# Altium PCB SYNC_BUCK_Si8233.PcbDoc
Units mil, origin at the board's own origin, x right, y up, seen from the top; angles counter-clockwise.
Board outline 3937.01 x 3937.01 mil, 2 copper layers (Top Layer, Bottom Layer); 119 components, 37 nets, 282 pads, 163 vias.
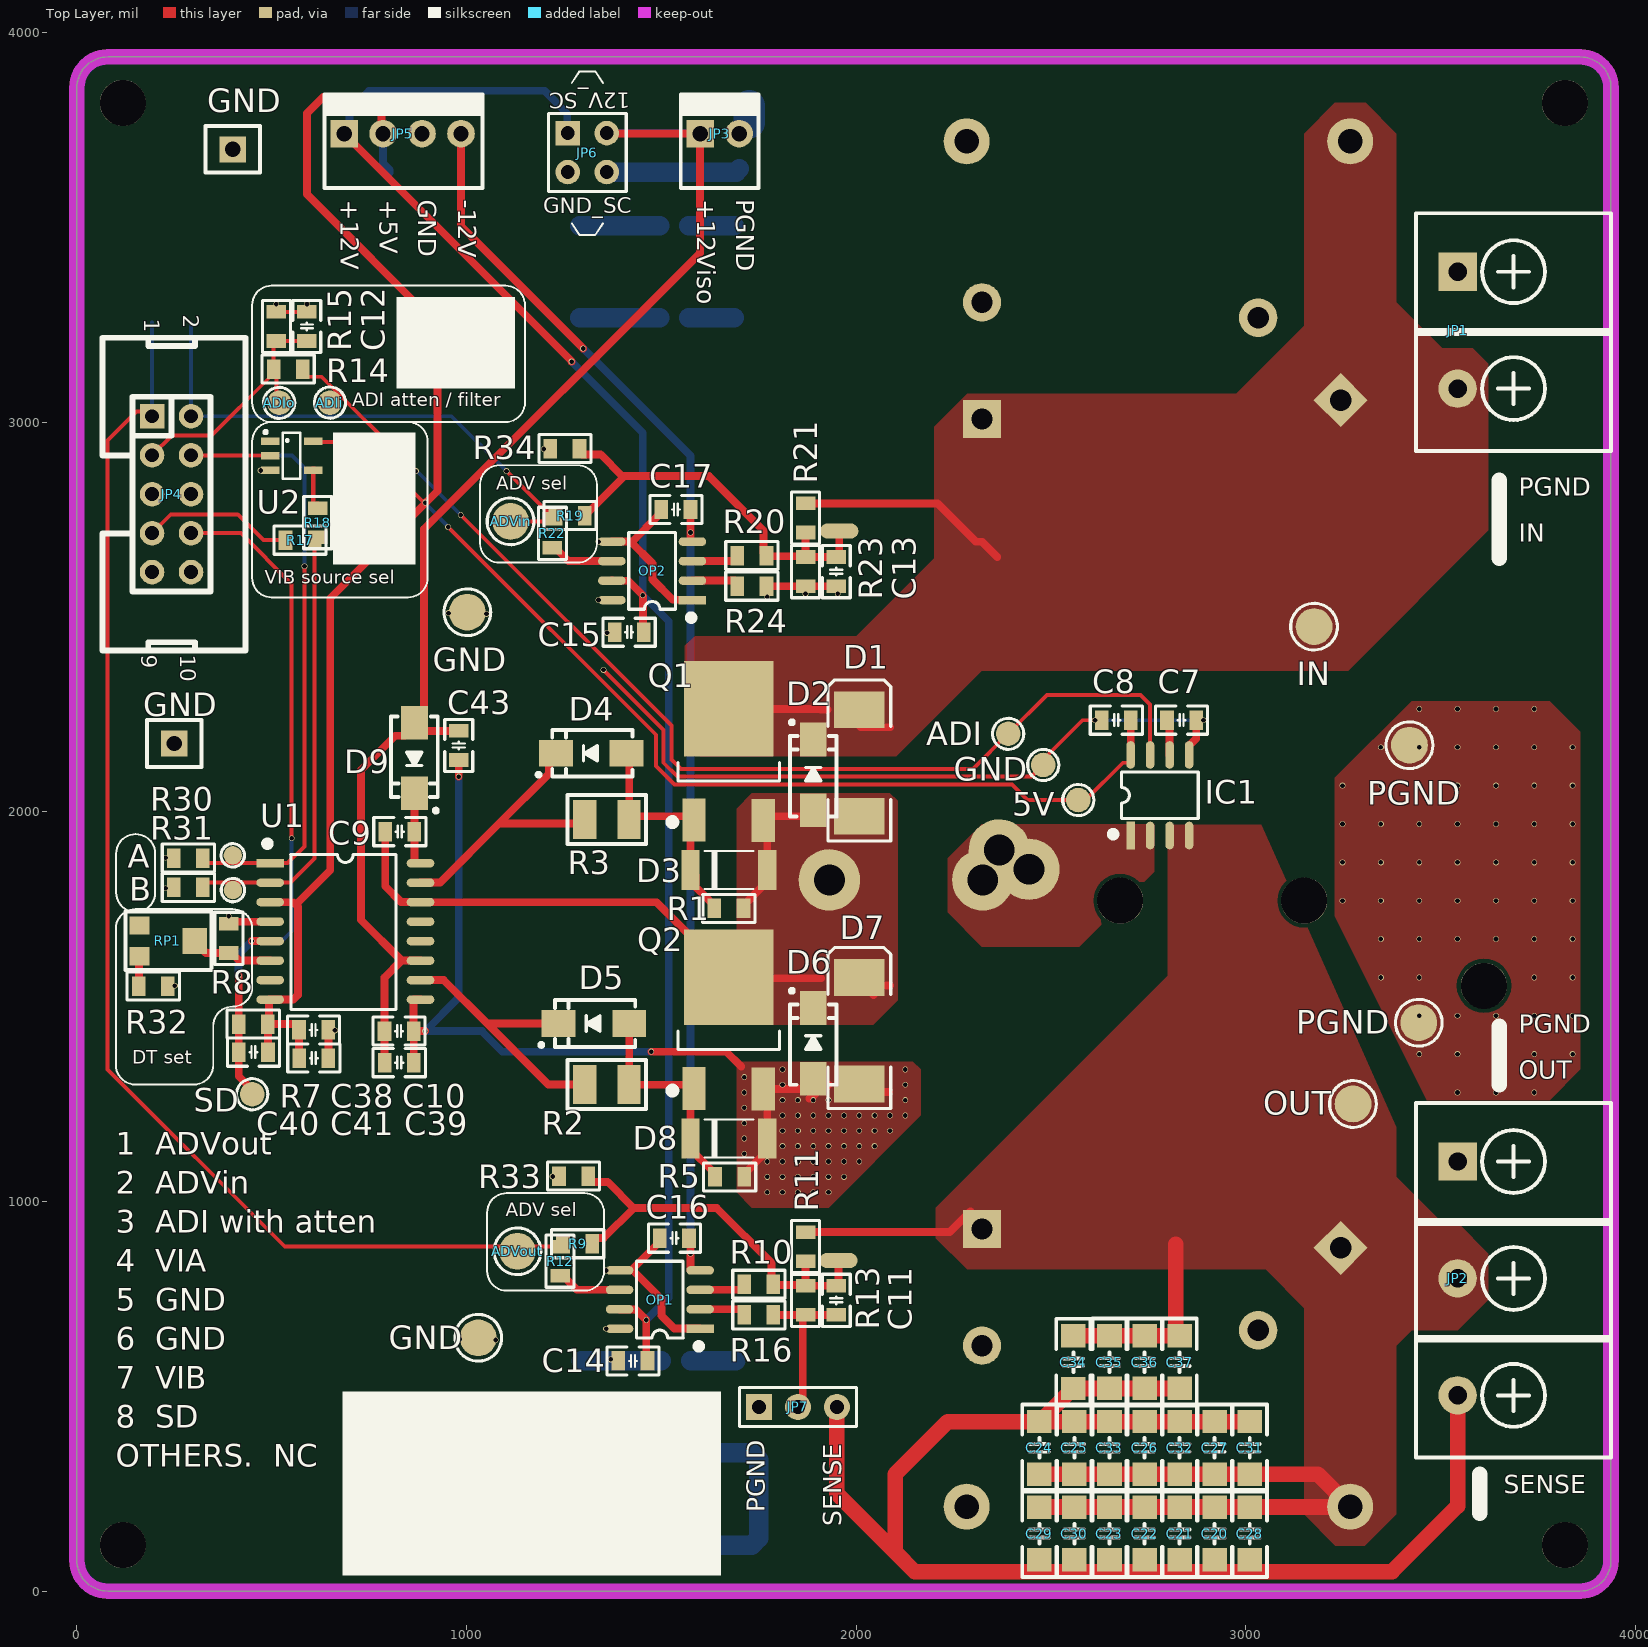
[diagram p0: Top Layer view]
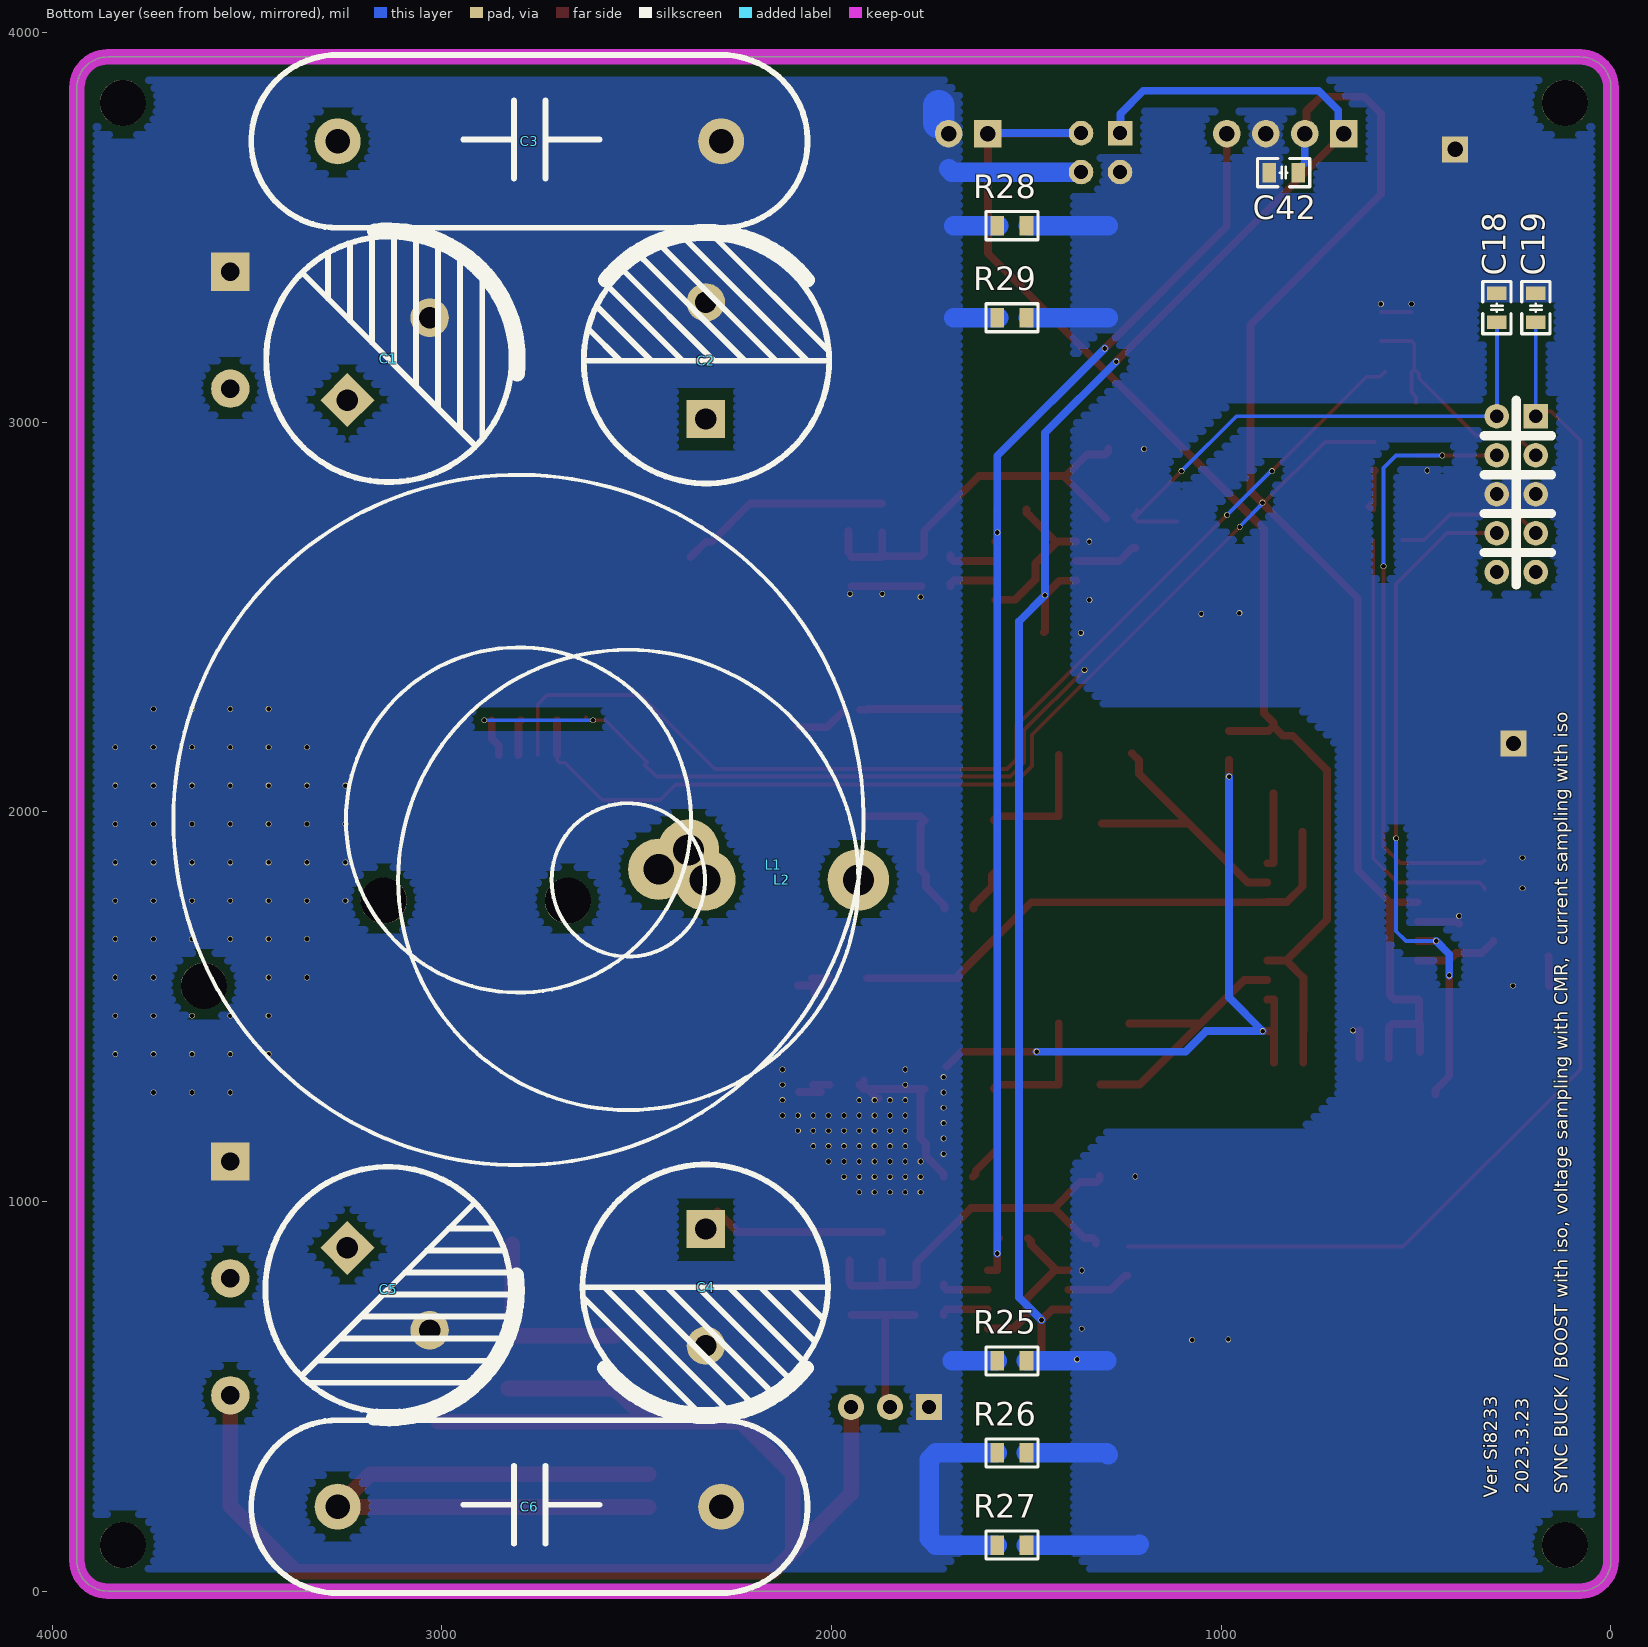
[diagram p1: Bottom Layer view, seen from below]

## Layer stack, top to bottom
Top Solder: solder mask 0.4, Solder Resist, Dk 3.5
Top Layer: signal copper 1.4
Dielectric 1: dielectric 12.6, FR-4, Dk 4.8
Bottom Layer: signal copper 1.4
Bottom Solder: solder mask 0.4, Solder Resist, Dk 3.5

## Board outline
0,78.74 0,3858.27 cw(c78.74,3858.27) 78.74,3937.01 3858.27,3937.01 cw(c3858.27,3858.27) 3937.01,3858.27 3937.01,78.74 cw(c3858.27,78.74) 3858.27,0 78.74,0 cw(c78.74,78.74)

## Design rules (kind name [scope] priority, off if disabled: settings)
Clearance GND [InNet('GND') And OnLayer('Bottom Layer')] p1: gap=10 ignorepadtopadclearanceinfootprint=TRUE except(0: Arc-Hole Track-Hole SMDPad-Hole THPad-Hole Via-Hole Text-Hole; 20: Arc-Fill Arc-Poly Arc-Region Track-Fill Track-Poly Track-Region SMDPad-Fill SMDPad-Poly SMDPad-Region THPad-Fill THPad-Poly THPad-Region Via-Fill Via-Poly Via-Region Fill-Fill Fill-Poly Fill-Region Fill-Hole Poly-Poly Poly-Region Poly-Hole Region-Region Region-Hole)
Clearance PGND_1 [InNet('PGND') And OnLayer('Bottom Layer')] p2: gap=10 ignorepadtopadclearanceinfootprint=TRUE except(0: Arc-Hole Track-Hole SMDPad-Hole THPad-Hole Via-Hole Text-Hole; 20: Arc-Fill Arc-Poly Arc-Region Track-Fill Track-Poly Track-Region SMDPad-Fill SMDPad-Poly SMDPad-Region THPad-Fill THPad-Poly THPad-Region Via-Fill Via-Poly Via-Region Fill-Fill Fill-Poly Fill-Region Fill-Hole Poly-Poly Poly-Region Poly-Hole Region-Region Region-Hole)
Clearance [All] p3: gap=10 ignorepadtopadclearanceinfootprint=TRUE except(0: Arc-Hole Track-Hole SMDPad-Hole THPad-Hole Via-Hole Fill-Text Poly-Text Region-Text Text-Hole)
HoleSize [All] p1 off: absolutevalues=TRUE maxlimit=100 minlimit=1 maxpercent=80.000 minpercent=20.000
MinimumSolderMaskSliver [All] p1 off: minsoldermaskwidth=10
PolygonConnect [All] p1: connectstyle=Direct reliefconductorwidth=10 reliefentries=4 polygonreliefangle="90 Angle" airgapwidth=10
RoutingVias [All] p1: holewidth=28 width=50 viastyle="Through Hole" minholewidth=28 minwidth=50 maxholewidth=28 maxwidth=50
SilkToSilkClearance [All] p1 off: silktosilkclearance=10
SilkToSolderMaskClearance [IsPad] p1 off: minsilkscreentomaskgap=10 clearancetoexposedcopper=TRUE
SolderMaskExpansion [All] p1: expansion=4 istentingtop=FALSE
Width [All] p1: maxlimit=100 minlimit=5 preferedwidth=10
26 further rules are at their usual default settings.

## Components (designator, comment, footprint, x,y, rotation, side; value= is the part's Value field where it differs from the comment)
5V "TEST" "TEST 1.6" 2570,2030 r180 top
A "TEST" "TEST 1.2" 400.1,1888.07 r180 top
ADI "TEST" "TEST 1.6" 2390,2200 r180 top
ADIi "TEST" "TEST 1.6" 649.47,3049.89 r180 top
ADIo "TEST" "TEST 1.6" 519.2,3049.34 r270 top
ADVin "TEST" "TEST 2.4" 1113.1,2745.2 r270 top
ADVout "TEST" "TEST 2.4" 1130.66,872.04 r270 top
B "TEST" "TEST 1.2" 400.42,1798.87 r180 top
C1 "1000uF" "CAP 7.5*16*25" 3136.22,3160.87 r135 bottom
C2 "1000uF" "CAP 7.5*16*25" 2321.33,3157.48 r90 bottom
C3 "4.7uF" "CBB 25" 2775.59,3720.47 r0 bottom
C4 "1000uF" "CAP 7.5*16*25" 2324.33,779.53 r270 bottom
C5 "1000uF" "CAP 7.5*16*25" 3138.34,774.02 r225 bottom
C6 "4.7uF" "CBB 25" 2775.59,216.54 r0 bottom
C7 "102" "C 0805_L" 2835,2234.96 r180 top
C8 "104" "C 0805_L" 2667.6,2234.96 r0 top
C9 "105" "C 0805_L" 828.74,1948.82 r0 top
C10 "475" "C 0805_L" 826.77,1437.01 r180 top
C11 "102" "C 0805_L" 1948.82,746.07 r90 top
C12 "103" "C 0805_L" 590,3245.4 r270 top
C13 "102" "C 0805_L" 1948.82,2616.14 r90 top
C14 "104" "C 0805_L" 1427.17,590.55 r0 top
C15 "104" "C 0805_L" 1417.32,2460.63 r0 top
C16 "104" "C 0805_L" 1533.47,905.51 r0 top
C17 "104" "C 0805_L" 1537.4,2775.59 r0 top
C18 "102" "C 0805_L" 293,3293.51 r90 bottom
C19 "102" "C 0805_L" 193,3293.51 r90 bottom
C20 "106" "C 1206_M" 2920,147.5 r90 top
C21 "106" "C 1206_M" 2830,147.5 r90 top
C22 "106" "C 1206_M" 2740,147.5 r90 top
C23 "106" "C 1206_M" 2650,147.5 r90 top
C24 "106" "C 1206_M" 2470,367.5 r270 top
C25 "106" "C 1206_M" 2560,367.5 r270 top
C26 "106" "C 1206_M" 2740,367.5 r270 top
C27 "106" "C 1206_M" 2920,367.5 r270 top
C28 "106" "C 1206_M" 3010,147.5 r90 top
C29 "106" "C 1206_M" 2470,147.5 r90 top
C30 "106" "C 1206_M" 2560,147.5 r90 top
C31 "106" "C 1206_M" 3010,367.5 r270 top
C32 "106" "C 1206_M" 2830,367.5 r270 top
C33 "106" "C 1206_M" 2650,367.5 r270 top
C34 "106" "C 1206_M" 2557.32,587.32 r90 top
C35 "106" "C 1206_M" 2650,587.5 r90 top
C36 "106" "C 1206_M" 2740,587.5 r90 top
C37 "106" "C 1206_M" 2830,587.5 r90 top
C38 "104" "C 0805_L" 607.4,1440 r0 top
C39 "106" "C 0805_L" 827.37,1355.91 r180 top
C40 "330" "C 0805_L" 453.14,1382.94 r0 top
C41 "105" "C 0805_L" 608.11,1367.66 r0 top
C42 "106" "C 0805_L" 840,3640 r0 bottom
C43 "106" "C 0805_L" 980,2170 r270 top
D1 "SS34" SMC 2007.87,2125 r90 top
D2 "SS34" SMA 1889.76,2094.49 r90 top
D3 "15V" LL41 1667.12,1843.64 r0 top
D4 "RS1M" SMA 1320,2150 r180 top
D5 "RS1M" SMA 1326.77,1456.69 r180 top
D6 "SS34" SMA 1889.76,1405.51 r90 top
D7 "SS34" SMC 2007.87,1437.99 r90 top
D8 "15V" LL41 1667.12,1154.66 r0 top
D9 "RS1M" SMA 866.14,2137.8 r270 top
GND "TEST" "TEST 1.6" 2480,2120 r180 top
GND "TEST TP" "TEST TP1.4_B" 400,3700 r180 top
GND "TEST TP" "TEST TP1.4_B" 250,2175 r180 top
GND "TEST" "TEST 2.4" 1030,650 r180 top
GND "TEST" "TEST 2.4" 1002,2512 r180 top
IC1 "ACS712" SOP8_N 2779.33,2042.32 r90 top
IN "TEST" "TEST 2.4" 3175,2475 r180 top
JP1 "HDR-1X2" KF7620-2P 3687.01,3235.83 r270 top
JP2 "HDR-1X3" KF7620-3P 3687.01,802.36 r270 top
JP3 "HDR-1X2" KF2510-LI-2P 1649.74,3740.16 r0 top
JP4 "Header 5X2" IDC2.54-LI-2x5P 193,3015 r270 top
JP5 "HDR-1X4" KF2510-LI-4P 835.83,3740.16 r0 top
JP6 "Header2X2" HDR2.54-LI-2x2P 1309.91,3691.59 r270 top
JP7 "HDR-1X3" HDR2.54-LI-3P 1850.39,472.44 r0 top
L1 "600uH" CS400125 2803.67,1978.82 r100 bottom
L2 "600uH" CS270125 2521.85,1825 r90 bottom
OP1 "INA117/AD629" SOP8_N 1496.06,748.03 r180 top
OP2 "INA117/AD629" SOP8_N 1476.38,2618.11 r180 top
OUT "TEST" "TEST 2.4" 3275,1250 r180 top
PGND "TEST" "TEST 2.4" 3443.73,1458.57 r270 top
PGND "TEST" "TEST 2.4" 3419.87,2170.79 r270 top
Q1 "AOD4184" TO252 1673.23,2098.43 r0 top
Q2 "AOD4184" TO252 1673.23,1409.45 r0 top
R1 "100K" "R 0805_L" 1673.23,1751.97 r0 top
R2 "4.7R" "R 1210_L" 1360,1300 r180 top
R3 "4.7R" "R 1210_L" 1360,1980 r0 top
R5 "100K" "R 0805_L" 1675.2,1063 r0 top
R7 "10k" "R 0805_L" 452.6,1455 r0 top
R8 "50k" "R 0805_L" 390,1675 r270 top
R9 "0R" "R 0805_L" 1285.06,891.36 r0 top
R10 "0R" "R 0805_L" 1750,787.4 r0 top
R11 "10K" "R 0805_L" 1870.08,883.86 r90 top
R12 "0R" "R 0805_L" 1240.16,846.46 r270 top
R13 "1K" "R 0805_L" 1870.08,746.07 r90 top
R14 "10K" "R 0805_L" 542.4,3136 r180 top
R15 "10K" "R 0805_L" 512,3245.4 r90 top
R16 "910R" "R 0805_L" 1750,708.66 r0 top
R17 "0R" "R 0805_L" 572.83,2696.85 r180 top
R18 "0R" "R 0805_L" 618.19,2741.79 r90 top
R19 "0R" "R 0805_L" 1265.6,2760 r0 top
R20 "0R" "R 0805_L" 1732.28,2657.48 r0 top
R21 "10K" "R 0805_L" 1870.08,2753.94 r90 top
R22 "0R" "R 0805_L" 1220.48,2714.56 r270 top
R23 "1K" "R 0805_L" 1870.08,2616.14 r90 top
R24 "910R" "R 0805_L" 1732.28,2578.74 r0 top
R25 "0R" "R 0805_L" 1537.4,590.55 r0 bottom
R26 "0R" "R 0805_L" 1537.4,354.33 r0 bottom
R27 "0R" "R 0805_L" 1537.4,118.11 r0 bottom
R28 "0R" "R 0805_L" 1537.4,3503.93 r0 bottom
R29 "0R" "R 0805_L" 1537.4,3267.71 r0 bottom
R30 "100k" "R 0805_L" 286.05,1881.07 r0 top
R31 "100k" "R 0805_L" 285.94,1805.84 r0 top
R32 "50k" "R 0805_L" 196.06,1552.61 r180 top
R33 "1K" "R 0805_L" 1274.6,1065 r0 top
R34 "1K" "R 0805_L" 1252.6,2932 r0 top
RP1 "100K" 3303W 231.52,1668.7 r270 top
SD "TEST" "TEST 1.6" 450,1275 r180 top
U1 "Si8233" SOP16W_N 688.98,1692.91 r0 top
U2 "SN74AHCT1G04" SOT23-5N 551.18,2913.39 r270 top

## Footprints (in the part's own frame and the unit in brackets; to place one, negate y for a bottom-side part, rotate by r counter-clockwise, add the part's x,y. Pads: shape width x height; smd on the part's side, far side on the other; paste and mask are expansions set on the pad)
3303W [mm] "3.5*3.1*1.5mm"
  rect 1.2x1.3 smd: 1(-1,-1.8) 3(1,-1.8)
  rect 1.7x1.6 smd: 2(0,1.8)
  silkscreen extent -1.9,-2.7 1.9,2.9, body extent -1.55,-2.06 1.55,2.05, height 1.45
"C 0805_L" [mil] "无极性贴片电容"
  rect 35x50 smd: 1(-37.4,0) 2(37.4,0)
  silkscreen extent -67,-36 67,36, body extent -39,-24 39,24, height 20
"C 1206_M" [mil] "无极性贴片电容"
  rect 60x62.99 smd: 1(-67.5,0) 2(67.5,0)
  silkscreen extent -112,-44 112,44, body extent -63,-32 63,32, height 48
"CAP 7.5*16*25" [mm] "脚距7.5mm直径16mm高度25mm"
  rect 2.5x2.5 hole 1.4: 1(-3.8,0.038)
  round 2.5 hole 1.4: 2(3.8,0.038)
  silkscreen extent -8,-8 8.42,8, body extent -8,-8 8.01,8, height 25.03
"CBB 25" [mm] "脚距25mm"
  round 3 hole 1.6: 1(-12.5,0) 2(12.5,0)
  silkscreen extent -18.13,-5.64 18.13,5.64
CS270125 [mm]
  round 4 hole 2: 1(0,-15) 2(0,-5)
  silkscreen extent -15,-15 15,15
CS400125 [mm]
  round 4 hole 2: 1(0,-22.5) 2(0,-11.25)
  silkscreen extent -22.5,-22.5 22.5,22.5
HDR2.54-LI-2x2P [mm]
  rect 1.6x1.6 hole 0.9: 1(-1.27,-1.27)
  round 1.6 hole 0.9: 2(-1.27,1.27) 3(1.27,-1.27) 4(1.27,1.27)
  silkscreen extent -2.54,-2.54 2.54,2.54, body extent -2.54,-2.54 2.54,2.54, height 8.5
HDR2.54-LI-3P [mm] "排针，3脚"
  rect 1.7x1.7 hole 0.9: 1(-2.54,0)
  round 1.7 hole 0.9: 2(0,0) 3(2.54,0)
  silkscreen extent -3.81,-1.27 3.81,1.27, body extent -3.81,-1.27 3.81,1.27, height 8.5
IDC2.54-LI-2x5P [mm] "10P简易牛角座"
  rect 1.6x1.6 hole 0.9: 1(0,0)
  round 1.6 hole 0.9: 2(0,2.54) 3(2.54,0) 4(2.54,2.54) 5(5.08,0) 6(5.08,2.54) 7(7.62,0) 8(7.62,2.54) 9(10.16,0) 10(10.16,2.54)
  silkscreen extent -5.11,-3.23 15.27,6.1, body extent -5.08,-3.08 15.24,5.77, height 9.17
KF2510-LI-2P [mm] "接插件/2A"
  rect 1.8x1.8 hole 1: 1(-1.27,0)
  round 1.8 hole 1: 2(1.27,0)
  silkscreen extent -2.59,-3.56 2.54,2.54, body extent -2.54,-3.5 2.54,2.4, height 11.05
KF2510-LI-4P [mm] "接插件/2A"
  rect 1.8x1.8 hole 1: 1(-3.81,0)
  round 1.8 hole 1: 2(-1.27,0) 3(1.27,0) 4(3.81,0)
  silkscreen extent -5.08,-3.56 5.21,2.54, body extent -5.08,-3.5 5.08,2.4, height 11.05
KF7620-2P [mm] "15.2*12*12mm(长宽高)"
  rect 2.5x2.5 hole 1.2: 1(-3.81,-3.65)
  round 2.5 hole 1.2: 2(3.81,-3.65)
  silkscreen extent -7.62,-6.35 7.87,6.35, body extent -7.62,-6.2 8.32,6.2, height 12.45
KF7620-3P [mm] "22.8*12*12mm(长宽高)"
  rect 2.5x2.5 hole 1.2: 1(-7.62,-3.65)
  round 2.5 hole 1.2: 2(0,-3.65) 3(7.62,-3.65)
  silkscreen extent -11.43,-6.35 11.68,6.35, body extent -11.43,-6.2 12.13,6.2, height 12.45
LL41 [mm]
  rect 1.2x2.6 smd: 1(2.655,0.172) 2(-2.345,0.172)
  silkscreen extent -1.44,-1.08 1.76,1.42
"R 0805_L" [mil] "1/8W贴片电阻   https://item.taobao.com/item.htm?ft=t&id=613637044352"
  rect 35x50 smd: 1(-37.4,0) 2(37.4,0)
  silkscreen extent -67,-36 67,36, body extent -39,-25 39,25, height 20
"R 1210_L" [mil] "1/3W贴片电阻"
  rect 60x100 smd: 1(-57.09,0) 2(57.09,0)
  silkscreen extent -100,-63 100,63, body extent -63,-49 63,49, height 22
SMA [mm] "4.5x2.6*2.2mm（长宽高，不包括引脚）"
  rect 2.2x1.75 smd: 1(-2.3,0) 2(2.3,0)
  silkscreen extent -2.7,-1.52 3.56,1.52, body extent -2.53,-1.3 2.58,1.3, height 2.15
SMC [mm] "DO-214-AB/SMC; 2 C-Bend Leads; Body 7.9 x 5.9 mm, inc. leads (LxW)"
  rect 2.4x3.3 smd: 1(-3.475,0) 2(3.475,0)
  silkscreen extent -5.07,-2.05 5.43,2.05
SOP8_N [mm] "5*6*1.8mm（长宽高）淘宝ID:小糖豆的小窝窝"
  rect 1.8x0.55 smd: 1(-2.625,1.905)
  oval 1.8x0.55 smd: 2(-2.625,0.635) 3(-2.625,-0.635) 4(-2.625,-1.905) 5(2.625,-1.905) 6(2.625,-0.635) 7(2.625,0.635) 8(2.625,1.905)
  silkscreen extent -2.69,-2.5 1.52,3.2, body extent -3,-2.5 3,2.5, height 1.9
SOP16W_N [mm] "10.3*10.3*2.6mm（长宽高）"
  rect 1.8x0.55 smd: 1(-4.9,4.445)
  oval 1.8x0.55 smd: 2(-4.9,3.175) 3(-4.9,1.905) 4(-4.9,0.635) 5(-4.9,-0.635) 6(-4.9,-1.905) 7(-4.9,-3.175) 8(-4.9,-4.445) 9(4.9,-4.445) 10(4.9,-3.175) 11(4.9,-1.905) 12(4.9,-0.635) 13(4.9,0.635) 14(4.9,1.905) 15(4.9,3.175) 16(4.9,4.445)
  silkscreen extent -5.23,-5.08 3.3,5.87, body extent -5.15,-5.15 5.15,5.15, height 2.7
SOT23-5N [mm] "3x1.6x1.1mm(长宽高)"
  rect 0.5x1.2 smd: 1(-0.95,-1.4) 2(0,-1.4) 3(0.95,-1.4) 4(0.95,1.4) 5(-0.95,1.4)
  silkscreen extent -1.63,-1.78 1.5,0.56, body extent -1.5,-1.4 1.5,1.4, height 1.15
"TEST 1.2" [mm] "测试点1.2mm"
  round 1.2 smd paste-1.2: 1(0,0)
  silkscreen extent -0.76,-0.76 0.76,0.76
"TEST 1.6" [mm] "测试点1.6mm"
  round 1.6 smd paste-1.6: 1(0,0)
  silkscreen extent -1.02,-1.02 1.01,1.02
"TEST 2.4" [mm] "测试点2.4mm"
  round 2.4 smd paste-2.4: 1(0,0)
  silkscreen extent -1.52,-1.52 1.52,1.52
"TEST TP1.4_B" [mm] "蓝色，测试环"
  rect 1.7x1.7 hole 1: 1(0,0)
  silkscreen extent -1.78,-1.52 1.78,1.52, body extent -1.67,-1.4 1.67,1.4, height 5.41
TO252 [mil] "252晶体管"
  rect 60x110 smd: 1(-89.55,-119.77) 3(88.45,-120.77)
  rect 230x245 smd: 2(0,165.35)
  silkscreen extent -153,-133 130,28, body extent -128,-120 128,251, height 91

## Part data
5V A ADI ADIi ADIo ADVin ADVout B GND GND GND IN OUT PGND PGND SD: "测试点", BOM名称=测试点, 下单链接=https://item.taobao.com/item.htm?ft=t&id=613637044352, 淘宝ID=小糖豆的小窝窝
C1 C2 C4 C5: library part CE, "直插电解电容", BOM名称=直插电解电容, 下单链接=https://item.taobao.com/item.htm?ft=t&id=613637044352, 淘宝ID=小糖豆的小窝窝
C3 C6: library part CBB, "CBB电容", BOM名称=CBB电容, 下单链接=https://item.taobao.com/item.htm?ft=t&id=613637044352, 淘宝ID=小糖豆的小窝窝
C7 C8 C9 C10 C11 C12 C13 C14 C15 C16 C17 C18 C19 C20 C21 C22 C23 C24 C25 C26 C27 C28 C29 C30 C31 C32 C33 C34 C35 C36 C37 C38 C39 C40 C41 C42 C43: library part C, "贴片电容", BOM名称=贴片电容, 下单链接=https://item.taobao.com/item.htm?ft=t&id=613637044352, 淘宝ID=小糖豆的小窝窝
D1 D2 D4 D5 D6 D7 D9: library part 1N4007, "整流二极管", BOM名称=整流二极管, 下单链接=https://item.taobao.com/item.htm?ft=t&id=613637044352, 淘宝ID=小糖豆的小窝窝
D3 D8: library part "D Zener", "Zener Diode", LatestRevisionDate=17-Jul-2002, LatestRevisionNote="Re-released for DXP Platform.", PackageDescription="Diode, Thru-Hole; 2 Leads; 0.7 in Pin Spacing", PackageReference=DIODE-0.7, Published=8-Jun-2000, Publisher="Altium Limited"
GND GND: "测试环", BOM名称=测试环, 下单链接=https://item.taobao.com/item.htm?ft=t&id=613637044352, 淘宝ID=小糖豆的小窝窝
IC1: "电流检测芯片", Alias1=https://item.taobao.com/item.htm?ft=t&id=613637044352, BOM名称=电流检测芯片, 淘宝ID=小糖豆的小窝窝
JP1 JP3: library part "Header 2", "2P接插件", BOM名称=2P接插件, 下单链接=https://item.taobao.com/item.htm?ft=t&id=613637044352, 淘宝ID=小糖豆的小窝窝
JP2 JP7: library part "Header 3", "3P接插件", BOM名称=3P接插件, 下单链接=https://item.taobao.com/item.htm?ft=t&id=613637044352, 淘宝ID=小糖豆的小窝窝
JP4: "5*2P接插件", BOM名称=5*2P接插件, 下单链接=https://item.taobao.com/item.htm?ft=t&id=613637044352, 淘宝ID=小糖豆的小窝窝
JP5: library part "Header 4", "4P接插件", BOM名称=4P接插件, 下单链接=https://item.taobao.com/item.htm?ft=t&id=613637044352, 淘宝ID=小糖豆的小窝窝
JP6: library part "Header 2X2", "2*2P接插件", BOM名称=2*2P接插件, 下单链接=https://item.taobao.com/item.htm?ft=t&id=613637044352, 淘宝ID=小糖豆的小窝窝
L1 L2: library part L-MR, "功率磁环电感", BOM名称=功率磁环电感, 下单链接=https://item.taobao.com/item.htm?ft=t&id=613637044352, 淘宝ID=小糖豆的小窝窝
OP1 OP2: library part INA117
Q1 Q2: library part IRF3710, "N沟场效应管", BOM名称=N沟场效应管, 下单链接=https://item.taobao.com/item.htm?ft=t&id=613637044352, 淘宝ID=小糖豆的小窝窝
R1 R2 R3 R5 R7 R8 R9 R10 R11 R12 R13 R14 R15 R16 R17 R18 R19 R20 R21 R22 R23 R24 R25 R26 R27 R28 R29 R30 R31 R32 R33 R34: library part R, "贴片电阻", BOM名称=贴片电阻, 下单链接=https://item.taobao.com/item.htm?ft=t&id=613637044352, 淘宝ID=小糖豆的小窝窝
RP1: library part RP-SMD, "贴片电位器", BOM名称=贴片电位器, 下单链接=https://item.taobao.com/item.htm?ft=t&id=613637044352, 淘宝ID=小糖豆的小窝窝
U1: library part Si8230/3, "Two inputs HS/LS isolated driver"
U2: library part SN74LVC1G04

## Free pads (board coordinates)
  round 118.11 hole 118.11: Q(118.11,118.11) Q(118.11,3818.9) Q(2677.17,1771.65) Q(3149.61,1771.65) Q(3611.08,1553.35) Q(3818.9,118.11) Q(3818.9,3818.9)
  oval 98.43x39.37 smd: Q(1954.44,848.21) Q(1956.4,2720.26)
  round 157.48 hole 78.74: Q(2443.48,1852.35)

## Via types
v1: diameter 15, hole 12, Top Layer to Bottom Layer, 163 vias

## Nets (pads, with @x,y where several pads share a name; then routed paths per layer and width w, separated by ;. In a path a pad name is that pad's centre, name@x,y a point inside that pad or via, vN(x,y) a via of type N, cw(c..) or ccw(c..) an arc to the next point about the centre after c; other vN are vias at no path point)
+5: 5V.1 C8.2 C38.1 C40.2 C41.1 C42.1 IC1.8 JP5.2 R7.2 U1.3 U1.8 U2.5 | length 6066.1
  Top Layer w10: U2.5@606.3,2949.27 734.16,2949.27 890.15,2793.29 v1(894.21,2793.29) ; v1(952.76,2730.68) 1485.96,2197.47 1485.96,2117.47 1533.43,2070 2400,2070 2440,2030 2588.66,2030 2684.36,2125.7 2698.95,2125.7 2704.33,2131.08 IC1.8
  Top Layer w20: C40.2 490.27,1383.21 490.27,1454.73 R7.2 ; U1.3 555.43,1767.91 561.67,1761.67 ; C41.1 570.35,1368.01 570.35,1439.65 C38.1 570,1447.5 562.5,1455 R7.2 ; JP5.2 781.42,3744.57 781.42,3798.37 745.02,3834.76 633.01,3834.76 590.55,3792.3 590.55,3684.48 590.55,3584.45 925.2,3249.8 925.2,2822.83 895.65,2793.29 v1(894.21,2793.29) 894.21,2791.85 650,2547.64 650,1850 561.67,1761.67 ; IC1.8 2704.65,2145.99 2704.65,2234.61 C8.2 ; R7.2 493.03,1458.03 493.03,1517.15 493.8,1517.91 U1.8 555.43,1517.91 567.14,1529.63 567.14,1756.2 561.67,1761.67
  Bottom Layer w10: v1(894.21,2793.29) 894.21,2790.83 952.76,2732.28 v1(952.76,2730.68)
  Bottom Layer w20: JP5.2 785.83,3664.27 802.6,3647.5 C42.1
+12: C14.2 C15.2 JP5.1 JP6.1 OP1.7 OP2.7 | length 4509.4
  Top Layer w20: JP5.1 1269.74,3156.24 v1(1269.74,3155) ; OP2.7 1373.25,2592.89 1415.16,2592.89 v1(1452.35,2555.7) ; OP1.7 1393.03,722.72 1434.08,722.72 v1(1461.3,695.49) 1461.3,600.39 1458.01,597.11 C14.2 ; v1@1452.61,2551.98 1452.61,2462.74 C15.2
  Bottom Layer w20: JP5.1 700,3754.33 700,3800 750,3850 1200,3850 1258.63,3791.37 1258.63,3742.87 JP6.1 ; v1(1269.74,3155) 1452.35,2972.39 v1(1452.35,2555.7) 1519,2489.05 1519,753.19 v1(1461.3,695.49)
+12iso: C10.2 C39.2 C43.1 D9.1 JP3.1 JP6.2 U1.11 | length 3468.4
  Top Layer w20: C39.2 789.67,1356.21 789.67,1436.71 C10.2 789.37,1574.37 833.23,1618.23 ; U1.11 881.57,1618.23 833.23,1618.23 ; C43.1 878.23,2207.4 D9.1@866.14,2219.49 ; JP6.2@1360.63,3740.87 JP3.1@1599.02,3740.87 ; JP3.1@1599,3739.42 1599,3433.65 890.59,2725.24 890.59,2252.8 D9.1 D9.1@866.14,2219.49 ; 833.23,1618.23 728.92,1722.54 728.92,2106.87 817.09,2195.04 841.69,2195.04 D9.1@866.14,2219.49
  Top Layer w50: JP6.2 JP6.2@1360.63,3740.87 ; JP3.1@1599.02,3740.87 JP3.1
  Bottom Layer w20: JP6.2 1598.31,3741.59 JP3.1
-12: C16.2 C17.2 JP5.4 OP1.4 OP2.4 | length 3313.2
  Top Layer w20: JP5.4 985.83,3502.36 v1(1299.21,3188.98) ; C16.2 1574.8,901.57 v1(1574.8,866.14) 1574.8,823.8 1575.57,823.03 OP1.4 ; C17.2 v1(1574.8,2716.54) 1574.8,2693.87 1575.57,2693.11 OP2.4
  Bottom Layer w20: v1(1299.21,3188.98) 1574.8,2913.39 v1(1574.8,2716.54) v1(1574.8,866.14)
ADI: ADI.1 ADIi.1 IC1.7 R14.1 | length 2866
  Top Layer w10: R14.1@580,3128.55 592.3,3116.24 627.77,3116.24 v1(870,2874.02) ; v1(985.07,2761.32) 988.19,2758.19 988.88,2758.19 1525.96,2221.11 1525.96,2134.04 1550,2110 2300,2110 ADI.1 2490,2300 2730,2300 2754.33,2275.67 IC1.7
  Bottom Layer w10: v1(870,2874.02) 871.35,2874.02 873.85,2871.52 874.87,2871.52 v1(985.07,2761.32)
ADVin: ADVin.1 C18.1 JP4.2 R19.1 R22.1 | length 1446.3
  Top Layer w10: v1(1102.36,2874.02) R19.1@1216.38,2760 ; ADVin.1 1215.7,2745.2 1220,2749.51 1220,2752.44 R19.1@1220.47,2752.9 ; R19.1@1215.7,2771.45 R19.1@1216.38,2770.76 ; R19.1@1215.7,2774.82 1216.38,2774.14 R19.1@1216.38,2770.76 ; R19.1@1220.29,2756.08 R19.1@1216.38,2760 ; R22.1 R19.1@1220.47,2752.9 ; R19.1 R19.1@1227.57,2760 ; R19.1@1216.38,2760 R19.1@1220.47,2760 ; R19.1@1216.38,2760 R19.1@1216.38,2770.76 ; R19.1@1216.38,2770.76 1220.47,2766.67 R19.1@1220.47,2760 ; R19.1@1220.47,2752.9 R19.1@1220.47,2760 ; R19.1@1220.47,2752.9 R19.1@1227.57,2760 ; R19.1@1220.47,2760 R19.1@1227.57,2760
  Bottom Layer w10: C18.1 JP4.2 961.38,3015 v1(1102.36,2874.02)
ADVout: ADVout.1 C19.1 JP4.1 R9.1 R12.1 | length 3355.3
  Top Layer w10: JP4.1 180.65,3027.35 153.34,3027.35 78.74,2952.76 78.74,1338.58 533.46,883.86 R12.1
  Bottom Layer w10: JP4.1 C19.1
GND: C7.1 C8.1 C12.1 C14.1 C15.1 C16.1 C17.1 C18.2 C19.2 C38.2 C41.2 C42.2 GND.1 IC1.5 JP4.5 JP4.6 JP5.3 JP6.3 OP1.1 OP1.5 OP1.8 OP2.1 OP2.5 OP2.8 R8.1 R15.2 R25.1 R26.1 R27.1 R28.1 R29.1 R30.1 R31.1 R32.1 R33.1 R34.1 U1.4 U2.3 | length 4096.7
  Top Layer w10: R15.2 C12.1 ; C38.2 C38.2@645.51,1439.3 ; v1(1351.28,2363.97) 1505.96,2209.29 1505.96,2125.75 1541.72,2090 2450,2090 2480,2120 GND.1@2473.66,2126.34 ; C14.1@1380.91,599.41 C14.1@1381.89,598.43 ; GND.1@2473.7,2128.04 2580.52,2234.86 v1(2612.65,2234.86) ; C8.1 C8.1@2630.2,2242.46
  Top Layer w20: R8.1 395.19,1717.6 495.75,1717.6 U1.4 ; C41.2 C38.2@645.51,1439.3 ; OP2.5 OP2.5@1397.19,2693.11 ; OP1.5 1423.03,823.03 1488.56,888.56 1488.56,898.01 C16.1 ; OP1.5@1426.97,823.03 1500,750 1500,707.03 1533.17,673.86 1598.58,673.86 OP1.1 ; C17.1 1500,2768.09 1492.5,2760.59 1425.02,2693.11 OP2.5@1397.19,2693.11 ; OP2.1 1578.9,2543.94 1529.44,2543.94 1477.25,2596.12 1477.25,2637.14 1421.59,2692.79 1397.51,2692.79 OP2.5@1397.19,2693.11 ; IC1.5 2854.33,2169.83 2872.4,2187.9 C7.1
  Bottom Layer w10: v1@2611.92,2235.09 2612.14,2234.87 2891.21,2234.87 v1(2891.43,2234.66)
  Bottom Layer w50: 1210,120 1211.89,118.11 R27.1 ; 1290,350 1294.33,354.33 R26.1 ; 1290.39,3267.72 R29.1@1496.06,3267.72 ; 1290.39,3503.94 R28.1@1496.06,3503.94 ; 1294.33,590.55 R25.1
  other v1: 1370.08,594.49 1074.82,644.47 982.41,645.96 1358.27,673.23 1358.27,822.83 1221,1064 662.29,1438.82 251.5,1553.55 389.76,1732.28 227.29,1803.82 227.29,1881.75 1360.43,2459.1 1051.35,2507.73 953.79,2509.64 1338.58,2543.48 1338.88,2693.12 471.48,2875.64 1198,2931 511.81,3303.15 590.55,3303.15
HO: D4.2 R3.1 U1.15 | length 727.8
  Top Layer w20: U1.15 882.21,1818.23 932.4,1818.23 1084.17,1970 ; D4.2 1211.44,2131.99 1211.44,2097.27 1084.17,1970 ; R3.1@1306.48,1970 1084.17,1970
IN: C1.1 C2.1 C3.2 D1.2 D2.2 IN.1 JP1.2 Q1.2 R21.2 | length 942.8
  Top Layer w20: Q1.2 1907.48,2263.78 1909.45,2261.81 1927.17,2261.81 ; R21.2 2208.66,2791.34 2307.24,2692.76 2322.99,2692.76 2362.2,2653.54 ; D1.2@1966.54,2261.81 2011.81,2216.54 2086.61,2216.54
LO: D5.2 R2.2 U1.10 | length 722.3
  Top Layer w20: U1.10 941.77,1567.91 1052.99,1456.69 ; D5.2 1052.99,1456.69 ; R2.2@1310,1300 R2.2 1209.68,1300 1052.99,1456.69
NetADIo_1: ADIo.1 C12.2 JP4.3 R14.2 R15.1 | length 657.1
  Top Layer w10: JP4.3 243.98,2965.98 345.98,2965.98 492.5,3112.5 492.5,3123.5 500,3131 R14.2 ; ADIo.1@500,3050 500,3064.34 512.36,3076.7 512.36,3128.64 R14.2 ; C12.2 R15.1 505,3201 R14.2
NetC7_2: C7.2 IC1.6 | length 92.1
  Top Layer w20: C7.2 2804.01,2228.55 2804.01,2145.99 IC1.6
NetC9_2: C9.2 D9.2 U1.16 | length 202.1
  Top Layer w20: C9.2 D9.2 ; C9.2@866.14,1956.32 866.14,1868.68 866.91,1867.91 U1.16
NetC11_1: C11.1 JP7.2 R13.1 R16.2 | length 402.7
  Top Layer w20: R16.2 1855.08,708.66 R13.1 C11.1 ; JP7.2 1850.39,485.14 1862.58,497.32 R13.1@1862.58,708.66
NetC11_2: C11.2 pad.Q@1954.44,848.21 R9.2 R10.2 R11.1 R13.2 R33.2 | length 1054.6
  Top Layer w20: R33.2 1312,1057.5 1319.5,1050 1362,1050 1429.16,982.84 ; R9.2 1322.46,898.86 1329.96,906.36 1352.36,906.36 1428.84,982.84 1429.16,982.84 ; R11.1 R13.2 ; C11.2 R13.2 ; C11.2@1954.44,792.93 pad.Q@1954.44,848.21 ; 1429.16,982.84 1642.3,982.84 1782.54,842.61 1782.54,792.27 1789.37,785.43 1868.11,785.43 R13.2
NetC13_2: C13.2 pad.Q@1956.4,2720.26 R19.2 R20.2 R21.1 R23.2 R34.2 | length 1084.4
  Top Layer w20: R34.2 1290,2924.5 1297.5,2917 1344,2917 1399.71,2861.29 1404.6,2861.29 ; R19.2@1295.28,2751.97 1404.6,2861.29 ; R21.1 R23.2 ; C13.2 R23.2 ; C13.2@1956.4,2664.98 pad.Q@1956.4,2720.26 ; 1404.6,2861.29 1622.16,2861.29 1762.18,2721.27 1762.18,2664.98 1771.65,2655.51 1868.11,2655.51 R23.2
NetD3_2: D3.2 D4.1 Q1.1 R1.1 R3.2 | length 583.4
  Top Layer w20: D4.1@1417.32,2145.67 1417.32,1988.19 1574.14,1988.19 Q1.1 1574.8,1969.78 D3.2 1588.43,1836.77 1588.43,1806.86 1635.82,1759.47 R1.1
NetD5_1: D5.1 D8.2 Q2.1 R2.1 R5.1 | length 584.2
  Top Layer w20: D5.1 1417.32,1299.21 1509.85,1299.21 1574.14,1299.21 Q2.1 1574.8,1280.8 D8.2 1574.8,1133.86 1630.3,1078.37 1630.3,1070.49 R5.1
NetIC1_1: IC1.1 IC1.2 L1.2 L2.2 pad.Q@2443.48,1852.35
NetJP4_7: JP4.7 R17.2 | length 389.7
  Top Layer w10: JP4.7 241,2763 413,2763 479.15,2696.85 R17.2
NetOP1_2: OP1.2 R16.1 | length 123.2
  Top Layer w20: OP1.2 1705.1,723.03 1712.6,715.53 R16.1
NetOP1_3: OP1.3 R10.1 | length 123.2
  Top Layer w20: OP1.3 1705.1,773.03 1712.6,780.53 R10.1
NetOP1_6: OP1.6 R12.2 | length 167.5
  Top Layer w20: R12.2 1247.65,809.06 1283.68,773.03 OP1.6
NetOP2_2: OP2.2 R24.1 | length 125.1
  Top Layer w20: OP2.2 1687.38,2593.11 1694.88,2585.61 R24.1
NetOP2_3: OP2.3 R20.1 | length 125.1
  Top Layer w20: OP2.3 1687.38,2643.11 1694.88,2650.61 R20.1
NetOP2_6: OP2.6 R22.2 | length 166.7
  Top Layer w20: R22.2 1227.97,2677.17 1262.03,2643.11 OP2.6
NetR8_2: R8.2 RP1.2 U1.6 | length 215.9
  Top Layer w20: RP1.2 302.39,1666.74 331.52,1637.6 R8.2 397.5,1637.6 417.18,1617.91 U1.6
NetR18_2: R18.2 U2.4 | length 376.9
  Top Layer w10: U2.4@607.57,2875.14 607.57,2774.74 R18.2@609.54,2772.77 ; R18.2@607.78,2786.56 U2.4@607.78,2876.2 ; R18.2@606.3,2786.34 U2.4 R18.2@606.3,2786.34
  Top Layer w20: U2.4 608.11,2875.98 U2.4@608.27,2875.83 ; R18.2@617.5,2785.5 R18.2@619.47,2783.53
NetR32_2: R32.2 RP1.3 | length 77.6
  Top Layer w20: R32.2 159.66,1553.61 159.66,1628.33 RP1.3
OUT: C4.1 C5.1 C6.2 C20.2 C21.2 C22.2 C23.2 C24.2 C25.2 C26.2 C27.2 C28.2 C29.2 C30.2 C31.2 C32.2 C33.2 C34.2 C35.2 C36.2 C37.2 IC1.3 IC1.4 JP2.2 OUT.1 R11.2 | length 2618.5
  Top Layer w20: R11.2 2240.16,921.26 C4.1@2293.31,974.41 ; C4.1@2301.08,907.38 C4.1
  Top Layer w40: C29.2 2470.77,215.77 3266.95,215.77 C6.2 3184.25,300 C31.2 C27.2 C32.2 C26.2 C33.2 C25.2 C24.2 ; C34.2 2557.41,654.91 2829.91,654.91 C37.2 2820,665 2820,890
PGND: C1.2 C2.2 C3.1 C4.2 C5.2 C6.1 C10.1 C13.1 C39.1 C43.2 D6.1 D7.1 D8.1 JP1.1 JP2.1 JP3.2 JP6.4 JP7.1 PGND.1 Q2.3 R5.2 R23.1 R24.2 R25.2 R26.2 R27.2 R28.2 R29.2 U1.9 | length 3840.6
  Top Layer w20: C39.1 864.47,1356.21 864.47,1436.71 C10.1 ; U1.9 864.94,1517.91 864.18,1517.15 C10.1 ; v1(893.7,1437.01) C10.1 ; v1(980,2090) C43.2 ; v1(1473.97,1384.29) 1666.9,1384.29 1705.05,1346.13 ; R5.2 1712.6,1070.49 1758.03,1115.93 1758.03,1147.8 D8.1 1771.65,1278.7 Q2.3 D6.1@1898.91,1288.68 ; R24.2 R23.1 C13.1 ; 1879.43,1263.78 1881.4,1265.75 ; 1883.37,1263.78 1917.82,1298.23 D6.1@1917.82,1311.02 ; D6.1@1918.6,1288.68 1929.13,1299.21 ; D7.1@2005.91,1299.21 D7.1@2048.23,1299.21 ; D7.1@2027.56,1280.51 2084.65,1280.51
  Bottom Layer w20: v1(980,2090) 980,1523.31 v1(893.7,1437.01) 1039.37,1437.01 1092.09,1384.29 v1(1473.97,1384.29)
  Bottom Layer w50: JP6.4 1691.59,3641.59 1700,3650 ; R29.2@1570.87,3267.72 1686.77,3267.72 ; R28.2@1570.87,3503.94 1686.77,3503.94 ; R27.2 1732.43,118.11 1750,135.68 1750,336.76 1732.43,354.33 R26.2 ; R25.2 1690.71,590.55
  Bottom Layer w80: 1725.36,3767.18 1725.36,3811.78
  other v1: 1771.65,1023.62 1811.02,1023.62 1850.39,1023.62 1889.76,1023.62 1929.13,1023.62 1771.65,1062.99 1811.02,1062.99 1850.39,1062.99 1889.76,1062.99 1929.13,1062.99 1968.5,1062.99 1771.65,1102.36 1811.02,1102.36 1850.39,1102.36 1889.76,1102.36 1929.13,1102.36 1968.5,1102.36 2007.87,1102.36 1712.6,1122.05 1811.02,1141.73 1850.39,1141.73 1889.76,1141.73 1929.13,1141.73 1968.5,1141.73 2007.87,1141.73 2047.24,1141.73 1712.6,1161.42 1811.02,1181.1 1850.39,1181.1 1889.76,1181.1 1929.13,1181.1 1968.5,1181.1 2007.87,1181.1 2047.24,1181.1 2086.61,1181.1 1712.6,1200.79 1811.02,1220.47 1850.39,1220.47 1889.76,1220.47 1929.13,1220.47 1968.5,1220.47 2007.87,1220.47 2047.24,1220.47 2086.61,1220.47 2125.98,1220.47 1712.6,1240.16 1811.02,1259.84 1850.39,1259.84 1889.76,1259.84 1929.13,1259.84 2125.98,1259.84 1712.6,1279.53 3543.31,1279.53 3641.73,1279.53 3740.16,1279.53 1811.02,1299.21 2125.98,1299.21 1712.6,1318.9 1811.02,1338.58 2125.98,1338.58 3444.88,1377.95 3543.31,1377.95 3641.73,1377.95 3740.16,1377.95 3838.58,1377.95 3444.88,1476.38 3543.31,1476.38 3641.73,1476.38 3740.16,1476.38 3838.58,1476.38 3346.46,1574.8 3444.88,1574.8 3740.16,1574.8 3838.58,1574.8 3346.46,1673.23 3444.88,1673.23 3543.31,1673.23 3641.73,1673.23 3740.16,1673.23 3838.58,1673.23 3248.03,1771.65 3346.46,1771.65 3444.88,1771.65 3543.31,1771.65 3641.73,1771.65 3740.16,1771.65 3838.58,1771.65 3248.03,1870.08 3346.46,1870.08 3444.88,1870.08 3543.31,1870.08 3641.73,1870.08 3740.16,1870.08 3838.58,1870.08 3248.03,1968.5 3346.46,1968.5 3444.88,1968.5 3543.31,1968.5 3641.73,1968.5 3740.16,1968.5 3838.58,1968.5 3248.03,2066.93 3346.46,2066.93 3444.88,2066.93 3543.31,2066.93 3641.73,2066.93 3740.16,2066.93 3838.58,2066.93 3346.46,2165.35 3444.88,2165.35 3543.31,2165.35 3641.73,2165.35 3740.16,2165.35 3838.58,2165.35 3444.88,2263.78 3543.31,2263.78 3641.73,2263.78 3740.16,2263.78 1771.65,2551.18 1870.08,2559.06 1952.76,2559.06
SD: C40.1 JP4.8 R7.1 SD.1 U1.5 | length 1785.7
  Top Layer w10: JP4.8 421,2715 551.31,2584.69 v1(551.31,1932)
  Top Layer w20: v1(415,1580) 415.2,1579.8 R7.1 415.2,1321.44 450,1286.63 SD.1 ; v1(448.77,1668.23) 495.75,1668.23 U1.5
  Bottom Layer w10: v1(448.77,1668.23) 526.23,1668.23 551.31,1693.31 v1(551.31,1932)
  Bottom Layer w20: v1(415,1580) 415,1634.46 v1(448.77,1668.23)
sense: C20.1 C21.1 C22.1 C23.1 C24.1 C25.1 C26.1 C27.1 C28.1 C29.1 C30.1 C31.1 C32.1 C33.1 C34.1 C35.1 C36.1 C37.1 JP2.3 JP7.3 | length 3812.4
  Top Layer w40: JP7.3 1950,472.05 1950,250 2100,100 ; C37.1 2829.91,519.91 2557.41,519.91 C34.1 2555.83,519.82 2545.83,509.82 2545.83,509.33 C24.1@2471.5,435 ; C31.1 C27.1 C32.1 C26.1 C33.1 C25.1 C24.1@2471.5,435 ; JP2.3 3543.31,218.31 3375,50 2150,50 2100,100 ; 2100,100 2100,300 2235,435 C24.1 C24.1@2471.5,435
VIA: A.1 JP4.4 R30.2 U1.1 U2.2 | length 1618.8
  Top Layer w10: JP4.4 293.81,2914.19 495.26,2914.19 U2.2 ; R30.2@324.9,1875.23 332.22,1867.91 U1.1 540.73,1867.91 584,1911.19 v1(584,2630)
  Bottom Layer w10: v1(433,2914) 552,2914 584,2882 v1(584,2630)
VIB: B.1 R17.1 R18.1 R31.2 U1.2 | length 1138.5
  Top Layer w10: R31.2@324.8,1800 324.8,1805.41 337.3,1817.91 400,1817.91 U1.2 547.91,1817.91 610.24,1880.24 R17.1
VS: C9.1 D1.1 D2.1 D3.1 D6.2 D7.2 L1.1 L2.1 Q1.3 Q2.2 R1.2 U1.14 | length 1975.3
  Top Layer w20: C9.1 791.34,1808.66 831.77,1768.23 881.57,1768.23 U1.14 1487.62,1767.91 1673.23,1582.3 Q2.2 1675.2,1572.83 1909.45,1572.83 ; R1.2 1710.63,1759.47 1758.03,1806.87 1758.03,1836.77 D3.1 1771.65,1967.68 Q1.3 1772.21,1988.19 1850.39,1988.19 D2.1@1909.45,1988.19 ; D7.2@2007.87,1572.83 D7.2@2050.2,1572.83 ; D7.2 D7.2@2044.29,1538.39 ; D7.2@2027.56,1554.13 2086.61,1554.13 ; D7.2@2044.29,1529.53 D7.2@2044.29,1538.39 ; D7.2@2044.29,1538.39 2028.05,1554.63 D7.2@2044.29,1538.39
pads on no net: JP4.9 JP4.10 RP1.1 U1.7 U1.12 U1.13 U2.1

## Polygon pours and split planes (outlines as drawn)
PGND on Top Layer "NONET_L02_P-001" (solid, remove dead copper, pour order 7): 1692.91,1358.27 1692.91,1023.62 1732.28,984.25 1929.13,984.25 2165.35,1220.47 2165.35,1338.58 2145.67,1358.27
VS on Top Layer "NONET_L02_P-001" (solid, remove dead copper, pour order 5): 1968.5,2047.24 1732.28,2047.24 1692.91,2007.87 1692.91,1476.38 1716.14,1453.16 2043.71,1453.16 2106.3,1515.75 2106.3,2027.56 2086.61,2047.24
PGND on Top Layer "NONET_L02_P-001" (solid, remove dead copper, pour order 10): 3228.35,2086.61 3425.2,2283.46 3779.53,2283.46 3858.27,2204.72 3858.27,1338.58 3779.53,1259.84 3464.57,1259.84 3228.35,1732.28
OUT on Top Layer "Top Layer-OUT" (solid, remove dead copper, pour order 3): 3050.59,825.39 3149.61,726.38 3149.61,196.85 3229.73,116.73 3305.71,116.73 3385.83,196.85 3385.83,629.92 3425.2,669.29 3543.31,669.29 3622.05,748.03 3622.05,866.14 3543.31,944.88 3503.94,944.88 3385.83,1062.99 3385.83,1190.6 3039.34,1967.13 2800,1967.13 2800,1579.53 2204.72,984.25 2204.72,905.51 2284.84,825.39
NetIC1_1 on Top Layer "NONET_L02_P-001" (solid, remove dead copper, pour order 4): 2234.52,1880.19 2234.52,1741.86 2322.83,1653.54 2572.9,1653.54 2765,1845.64 2765,1968.5 2322.83,1968.5
IN on Top Layer "NONET_L02_P-001" (solid, remove dead copper, pour order 0): 3622.05,3149.61 3622.05,2722.05 3262.2,2362.2 2322.83,2362.2 2102.39,2141.76 1598.4,2141.76 1559.58,2180.57 1559.58,2425.73 1585.73,2450 2000,2450 2200,2650 2200,2987.4 2285.43,3072.83 2975,3072.83 3149.61,3247.44 3149.61,3740.15 3228.36,3818.9 3307.09,3818.9 3385.83,3740.16 3385.83,3307.09 3503.94,3188.98 3582.68,3188.98
GND on Bottom Layer "NONET_L02_P-001" (hatched Horizontal grid 20 track 20, remove dead copper, pour order 9): 1377.95,98.43 1279.53,0 -1082.68,0 -1082.68,3937.01 1279.53,3937.01 1377.95,3838.58
PGND on Bottom Layer "tga" (hatched Horizontal grid 20 track 20, remove dead copper, pour order 6): 1673.23,98.43 1771.65,0 4133.86,0 4133.86,3937.01 1771.65,3937.01 1673.23,3838.58

## Keep-outs
Keep-Out Layer:
  lines w40: 3937.01,3858.27 ccw(c3858.27,3858.27) 3858.27,3937.01 78.74,3937.01 ccw(c78.74,3858.27) 0,3858.27 0,78.74 ccw(c78.74,78.74) 78.74,0 3858.27,0 ccw(c3858.27,78.74) 3937.01,78.74 3937.01,3858.27 ; 3937.01,3858.27 3937.01,3858.27

## Other copper
Bottom Layer:
  pour cut-out: 1510,2484.25 1289.53,2263.78 797.4,2263.78 698.98,2165.35 698.98,1279.53 797.4,1181.1 1289.53,1181.1 1510,960.63

## Silkscreen, mask and mechanical layers (free items; w line width, h text height)
Top Overlay:
  rectangle: 681.89,39.37 1653.54,511.81
  region: 869.23,2634.68 869.23,2972.65 657.59,2972.65 657.59,2634.68
  rectangle: 820.48,3086.38 1124.33,3320.36
  lines w5: 450,2650 450,2950 cw(c500,2950) 500,3000 ; 450,2850 450,2600 ccw(c500,2600) 500,2550 850,2550 ccw(c850,2600) 900,2600 900,2950 ccw(c850,2950) 850,3000 500,3000 ; 1270,3510 1290,3480 1330,3480 1350,3510 ; 1270,3870 1290,3900 1330,3900 1350,3870 ; 500,3000 cw(c500,3050) 450,3050 450,3300 cw(c500,3300) 500,3350 1100,3350 cw(c1100,3300) 1150,3300 1150,3050 cw(c1100,3050) 1100,3000 500,3000 ; 100,1350 ccw(c150,1350) 150,1300 300,1300 ccw(c300,1350) 350,1350 350,1450 cw(c400,1450) 400,1500 ccw(c400,1550) 450,1550 450,1700 ccw(c400,1700) 400,1750 150,1750 ccw(c150,1700) 100,1700 100,1350 ; 100.99,1792.45 ccw(c150.99,1792.45) 150.99,1742.45 ccw(c150.99,1792.45) 200.99,1792.45 200.99,1892.45 ccw(c150.99,1892.45) 150.99,1942.45 ccw(c150.99,1892.45) 100.99,1892.45 100.99,1792.45 ; 1034.67,2689.2 ccw(c1084.67,2689.2) 1084.67,2639.2 1284.67,2639.2 ccw(c1284.67,2689.2) 1334.67,2689.2 1334.67,2839.2 ccw(c1284.67,2839.2) 1284.67,2889.2 1084.67,2889.2 ccw(c1084.67,2839.2) 1034.67,2839.2 1034.67,2689.2 ; 1052.79,821.06 ccw(c1102.79,821.06) 1102.79,771.06 1302.79,771.06 ccw(c1302.79,821.06) 1352.79,821.06 1352.79,971.06 ccw(c1302.79,971.06) 1302.79,1021.06 1102.79,1021.06 ccw(c1102.79,971.06) 1052.79,971.06 1052.79,821.06
  lines w40: 3600,200 3600,300 ; 3650,1300 3650,1450 ; 3650,2650 3650,2850
  text "+12Viso" at 1576.5,3571.65 h80 r270
  text "PGND" at 1676.5,3571.65 h80 r270
  text "+12V" at 661.28,3570.73 h80 r270
  text "+5V" at 761.28,3570.73 h80 r270
  text "GND" at 861.28,3570.73 h80 r270
  text "-12V" at 962.93,3570.29 h80 r270
  text "ADI atten / filter" at 706.51,3028.99 h60
  text "ADV sel" at 1076.8,2814.4 h60
  text "PGND" at 3700.79,2795.28 h80
  text "IN" at 3700.79,2677.17 h80
  text "VIB source sel" at 482.52,2572.94 h60
  text "PGND" at 3700.79,1417.32 h80
  text "DT set" at 142.57,1341.97 h60
  text "OUT" at 3700.79,1299.21 h80
  text "1  ADVout" at 100,1100 h100
  text "2  ADVin" at 100,1000 h100
  text "ADV sel" at 1100,950 h60
  text "3  ADI with atten" at 100,900 h100
  text "4  VIA" at 100,800 h100
  text "5  GND" at 100,700 h100
  text "6  GND" at 100,600 h100
  text "7  VIB" at 100,500 h100
  text "8  SD" at 100,400 h100
  text "OTHERS.  NC" at 100,300 h100
  text "SENSE" at 3661.42,236.22 h80
  text "PGND" at 1780.07,201.92 h80 r90
  text "SENSE" at 1976.64,165.85 h80 r90
Bottom Overlay:
  text "SYNC BUCK / BOOST with iso, voltage sampling with CMR,  current sampling with iso" at 100,250 h60 r270
  text "2023.3.23" at 200,250 h60 r270
  text "Ver Si8233" at 280,240 h60 r270
Top Solder:
  lines w50: 2100,2400 2250,2550 3075,2550 3425,2900 ; 2150,2300 2300,2450 2350,2450 3075,2450 ; 2250,2750 2450,2950 3000,2950 3200,3150 3200,3550 3200,3600 ; 2275,2650 3000,2650 3350,3000 3350,3600 ; 2400,2750 2950,2750 ; 2425,1025 2950,1550 2950,1800 ; 2500,2850 3050,2850 3150,2950 ; 2700,1000 3250,1000 ; 3089.31,1378.35 2810.97,1100 3200,1100 3307.09,1100 ; 3100,1550 2550,1000 2450,900 3050,900 3200,750 3200,300 ; 3250,2550 3550,2850 ; 3350,300 3350,850 ; 3350,800 3350,950
Mechanical 1:
  lines w10: 3942.01,78.74 ccw(c3937.01,78.74) 3942.01,78.82 ; 3942.01,78.74 ccw(c3937.01,78.74) 3942.01,78.82 ; 3942.01,78.74 cw(c3858.27,78.74) 3858.27,-5 78.74,-5 cw(c78.74,78.74) -5,78.74 -5,3858.27 cw(c78.74,3858.27) 78.74,3942.01 3858.27,3942.01 cw(c3858.27,3858.27) 3942.01,3858.27 3942.01,78.82 ; 3942.01,78.74 3942.01,78.82

## Text inside footprints (layer, text, board x,y; h text height)
JP4: Top Overlay "10" at 265,2403 h40 r270; Top Overlay "9" at 165,2403 h40 r270; Top Overlay "1" at 173,3265 h40 r270; Top Overlay "2" at 273,3275 h40 r270
JP6: Top Overlay "12V_SC" at 1420.36,3845.26 h40 r180; Top Overlay "GND_SC" at 1196.94,3536.32 h40